# Altium PCB PD_BQ_Ref_Design_PCB.PcbDoc (part 1 of 4)
Units mil, origin at the board's own origin, x right, y up, seen from the top; angles counter-clockwise.
Board outline 2000 x 3702.76 mil, 4 copper layers (Top Layer, Signal Layer 1, Signal Layer 2, Bottom Layer), stack 61.2 mil thick; 124 components, 53 nets, 359 pads, 494 vias.
Unrouted connection lines stored in the file: 227.
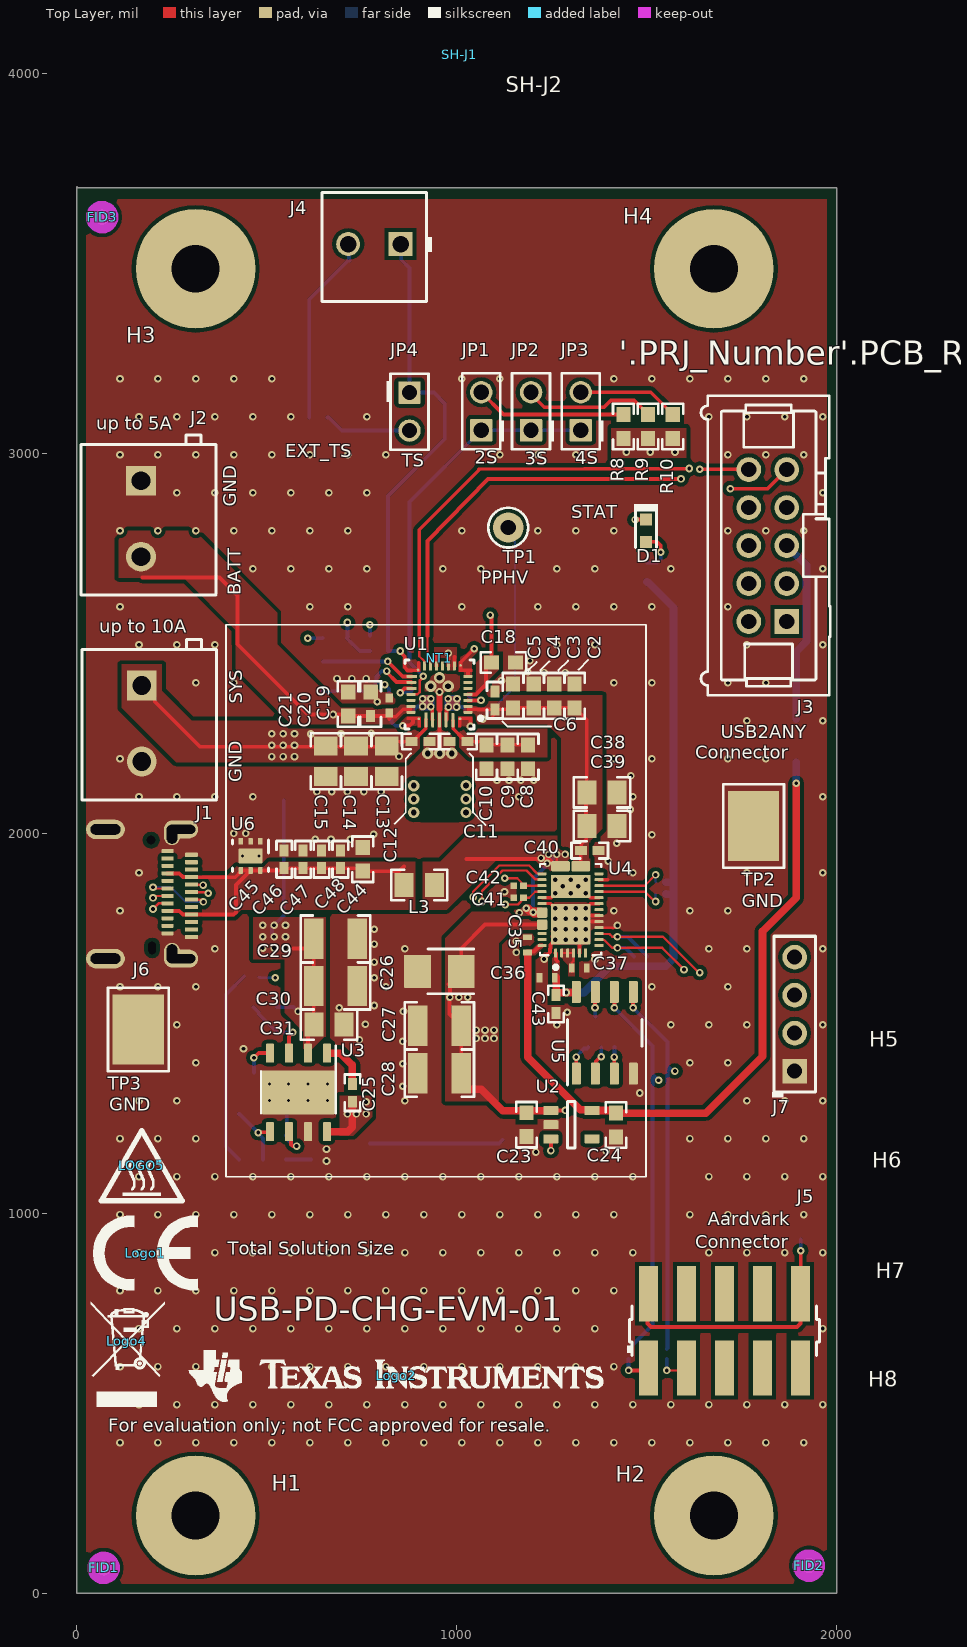
[diagram p0: Top Layer view]
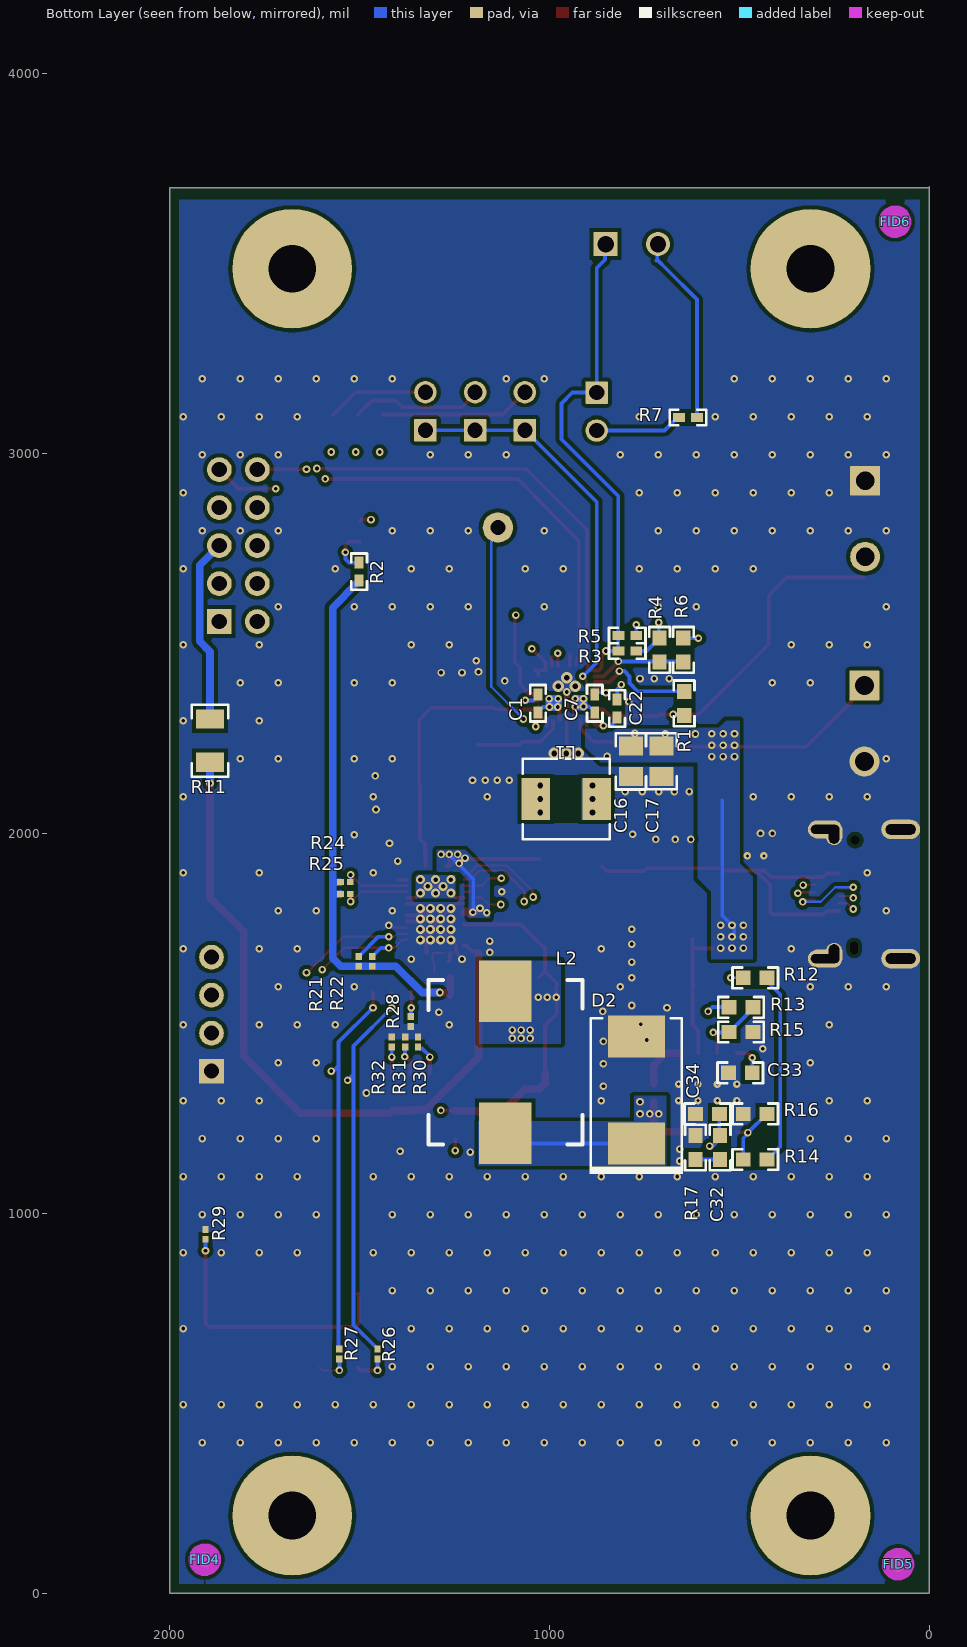
[diagram p1: Bottom Layer view, seen from below]
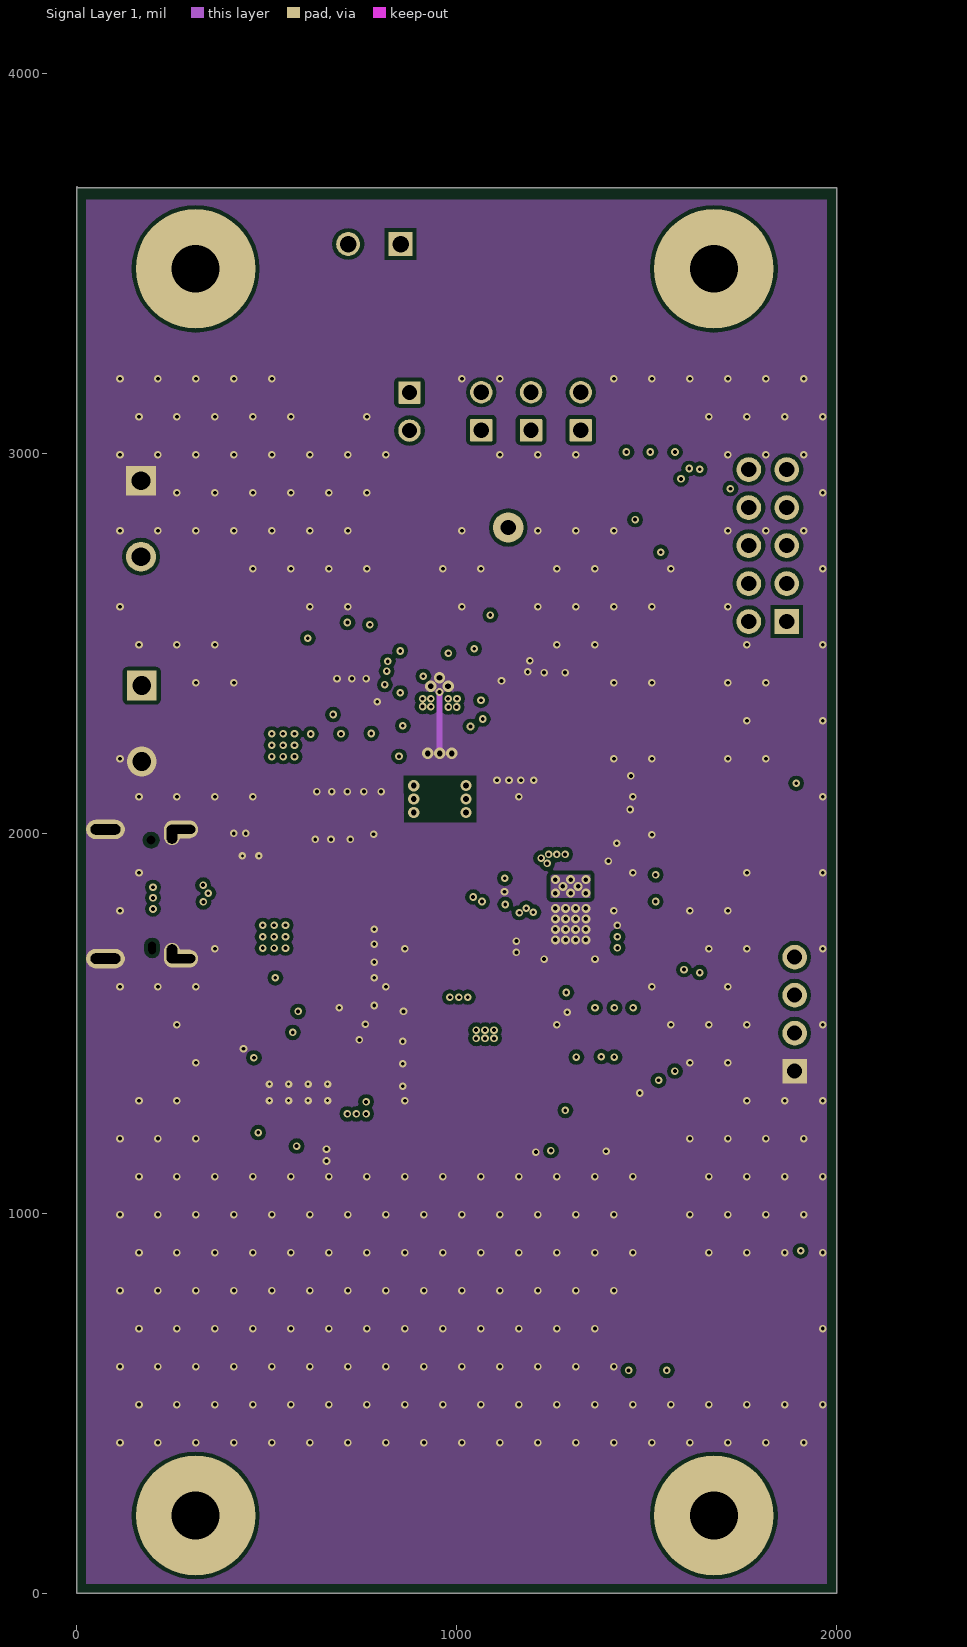
[diagram p2: Signal Layer 1]
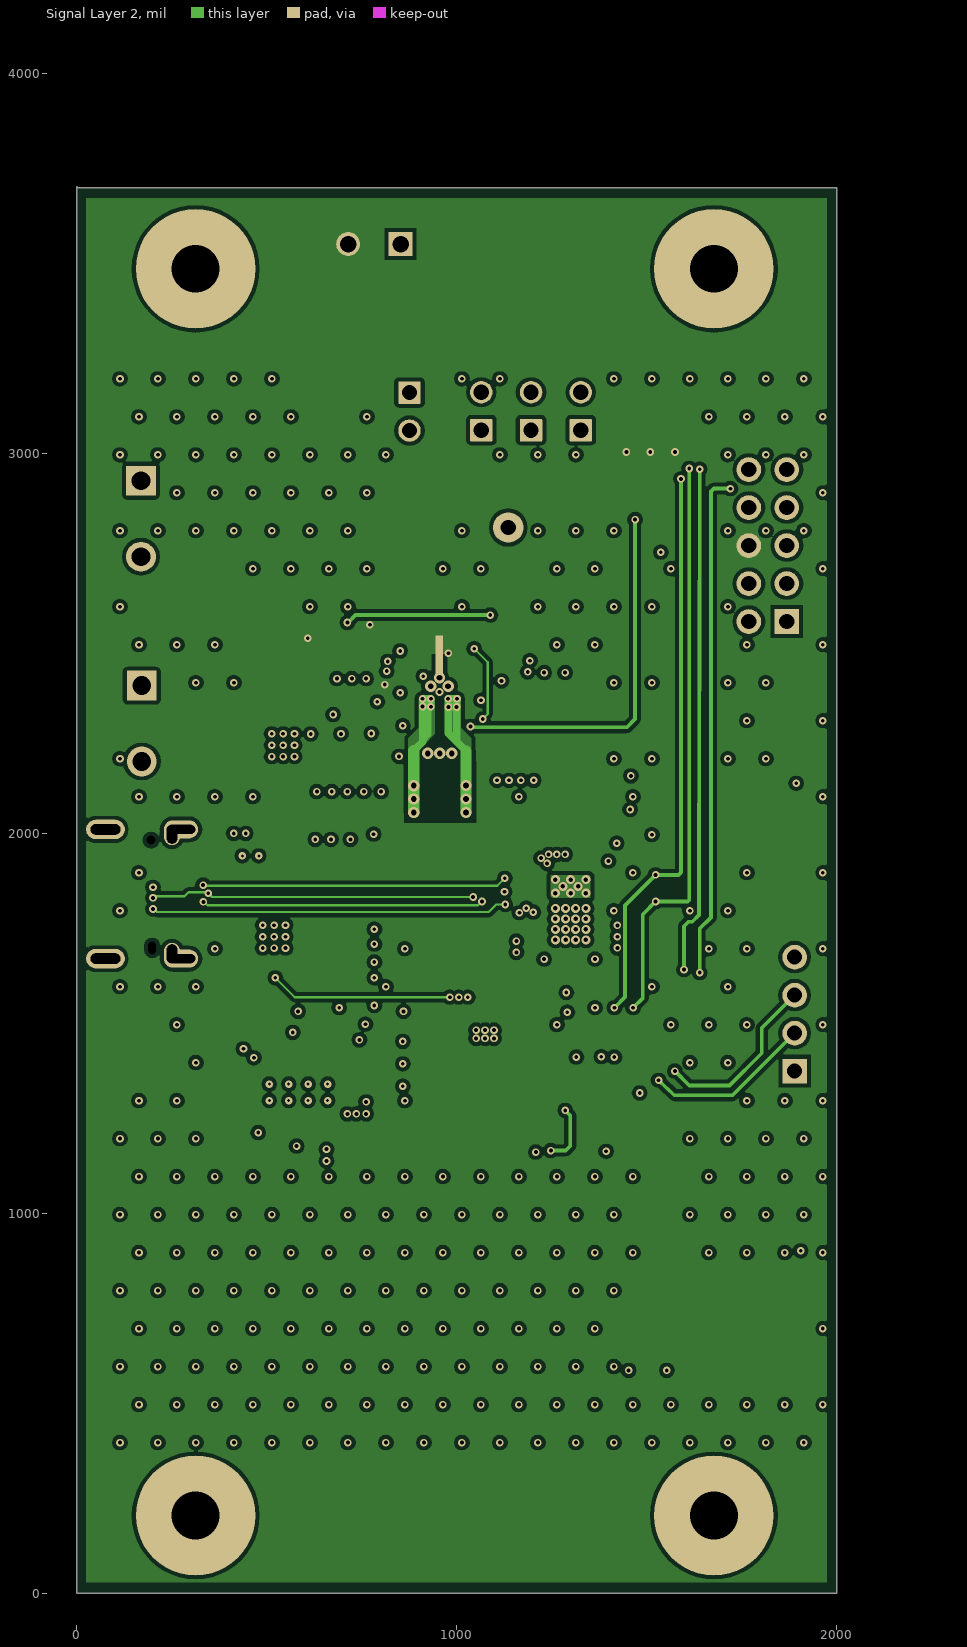
[diagram p3: Signal Layer 2]

## Layer stack, top to bottom
Top Solder: solder mask 0.4, Solder Resist, Dk 3.5
Top Layer: signal copper 2.8
Dielectric 1: prepreg 12, FR-4 High TG, Dk 4.2
Signal Layer 1: signal copper 2.8
Dielectric2: core 26, FR-4 High TG, Dk 4.2
Signal Layer 2: signal copper 2.8
Dielectric3: prepreg 12, FR-4 High TG, Dk 4.2
Bottom Layer: signal copper 2.8
Bottom Solder: solder mask 0.4, Solder Resist, Dk 3.5

## Board outline
0,0 2000,0 2000,3700 2.76,3700 0,3702.76

## Design rules (kind name [scope] priority, off if disabled: settings)
AcuteAngle [All] p1: minimum=4.50000000000000E+0001 checktracksonly=FALSE
AssemblyTestPointUsage [All] p1: valid=2
BoardOutlineClearance BoardOutlineClearance_MountingHoles [OnCopper and InComponentClass('Mounting Holes')] p1: gap=39.37 ignorepadtopadclearanceinfootprint=FALSE
BoardOutlineClearance BoardOutlineClearance_Poly [OnCopper and IsPoly] p2: gap=25 ignorepadtopadclearanceinfootprint=FALSE
BoardOutlineClearance [OnCopper and Not InComponentClass('Logo') and not InComponentClass('FiducialMark') and not InRegion(1000,500,4000,800) and not InPoly] p3: gap=15 ignorepadtopadclearanceinfootprint=FALSE
Clearance Clearance_Keepouts [((IsTrack Or IsArc) And Not InPoly) And IsFree and IsKeepOut vs ((IsTrack Or IsArc) And Not InPoly) And IsFree and IsKeepOut] p1: gap=0 ignorepadtopadclearanceinfootprint=FALSE
Clearance Clearance_Poly [InPolygon] p2: gap=10 ignorepadtopadclearanceinfootprint=TRUE
Clearance Clearance_FiducialMark [IsKeepOut and InComponentClass('FiducialMark') vs IsPad and InComponentClass('FiducialMark')] p3: gap=0 ignorepadtopadclearanceinfootprint=FALSE
Clearance [All] p4: gap=5 ignorepadtopadclearanceinfootprint=TRUE
ComponentClearance ComponentClearance_MountingHoles_FiducialMarks [InComponentClass('Mounting Holes') vs InComponentClass('FiducialMark')] p1: gap=50 collisioncheckmode=3 verticalgap=10 showdistances=FALSE
ComponentClearance ComponentClearance_Shunt [InComponentClass('Header') vs InComponentClass('Shunt')] p2: gap=0 collisioncheckmode=3 verticalgap=0 showdistances=FALSE
ComponentClearance ComponentClearance_Logo [InComponentClass('Logo')] p3: gap=50 collisioncheckmode=3 verticalgap=10 showdistances=FALSE
ComponentClearance ComponentClearance_ScrewToNut [(HasFootprint('NY PMS 440 0025 PH')) vs (HasFootprint('Keystone_1902C'))] p4: gap=5 collisioncheckmode=3 verticalgap=10 showdistances=FALSE
ComponentClearance ComponentClearance_MountingHoles [InComponent('H1')] p5: gap=25 collisioncheckmode=3 verticalgap=100000 showdistances=FALSE
ComponentClearance ComponentClearance_SmallPassives [HasFootprint('0201*') or HasFootprint('0402*') or HasFootprint('0508') or HasFootprint('0603*') or HasFootprint('0612') or HasFootprint('0805*') or HasFootprint('0815*') or HasFootprint('0830*') or HasFootprint('1206*') or HasFootprint('1210*') or HasFootprint('1808*') or HasFootprint('1812*') or HasFootprint('1825*') or HasFootprint('2010*') or HasFootprint('2220*') or HasFootprint('2225*') or HasFootprint('2512*') or HasFootprint('2728*') or HasFootprint('3518*') vs HasFootprint('0201*') or HasFootprint('0402*') or HasFootprint('0508') or HasFootprint('0603*') or HasFootprint('0612') or HasFootprint('0805*') or HasFootprint('0815*') or HasFootprint('0830*') or HasFootprint('1206*') or HasFootprint('1210*') or HasFootprint('1808*') or HasFootprint('1812*') or HasFootprint('1825*') or HasFootprint('2010*') or HasFootprint('2220*') or HasFootprint('2225*') or HasFootprint('2512*') or HasFootprint('2728*') or HasFootprint('3518*')] p6: gap=14.96 collisioncheckmode=3 verticalgap=10 showdistances=FALSE
ComponentClearance ComponentClearance_THtoSMT [IsThruComponent vs IsSMTComponent] p7: gap=40 collisioncheckmode=3 verticalgap=30 showdistances=FALSE
ComponentClearance ComponentClearance_THtoTH [IsThruComponent vs IsThruComponent] p8: gap=30 collisioncheckmode=3 verticalgap=30 showdistances=FALSE
ComponentClearance [All] p9: gap=20 collisioncheckmode=3 verticalgap=10 showdistances=FALSE
DiffPairsRouting [All] p1: maxlimit=100 minlimit=10 mostfreqgap=10 toplayer_minwidth=15 toplayer_maxwidth=15 toplayer_prefwidth=15 midlayer1_minwidth=15 midlayer1_maxwidth=15 midlayer1_prefwidth=15 midlayer2_minwidth=15 midlayer2_maxwidth=15 midlayer2_prefwidth=15 bottomlayer_minwidth=15 bottomlayer_maxwidth=15 bottomlayer_prefwidth=15 maxuncoupledlength=1000
FabricationTestPointUsage TestPointUsage [All] p1: valid=2 allowmultiple=FALSE
FabricationTestpoint Testpoint [All] p1: side=3 testpointundercomponent=TRUE minsize=40 maxsize=100 preferedsize=60 minholesize=0 maxholesize=40 preferedholesize=32 testpointgrid=1 allowsidetop=TRUE allowsidebottom=TRUE usegrid=TRUE gridtolerance=0.01
FanoutControl Fanout_LCC [IsLCC] p1: bgadir=Out bgaviamode=Centered fanoutstyle=Auto fanoutdirection=Alternating viagrid=1 // Fanout_LCC (Default Rule)
FanoutControl Fanout_BGA [IsBGA] p2: bgadir=Out bgaviamode=Centered fanoutstyle=Auto fanoutdirection=Alternating viagrid=1 // Fanout_BGA (Default Rule)
FanoutControl Fanout_Default [All] p4: bgadir=Out bgaviamode=Centered fanoutstyle=Auto fanoutdirection=Alternating viagrid=1 // Fanout_Default (Default Rule)
FanoutControl Fanout_Small [(CompPinCount < 5)] p5: bgadir=Out bgaviamode=Centered fanoutstyle=Auto fanoutdirection=OutThenIn viagrid=1 // Fanout_Small (Default Rule)
HoleSize [All] p1: absolutevalues=TRUE maxlimit=251 minlimit=7.87 maxpercent=80.000 minpercent=20.000
MinimumAnnularRing MinimumAnnularRing_ThermalPadVias [IsVia and InAnyComponent] p1: minimumring=5.91
MinimumAnnularRing [All] p2: minimumring=5
MinimumSolderMaskSliver MinimumSolderMaskSliver_Logo [InComponentClass('Logo') vs InComponentClass('Logo')] p1: minsoldermaskwidth=0.7
MinimumSolderMaskSliver [All] p2: minsoldermaskwidth=3
PlaneConnect [All] p1: planeconnectstyle=Relief reliefexpansion=10 reliefentries=4 reliefconductorwidth=10 reliefairgap=10
PolygonConnect [All] p1: connectstyle=Direct reliefconductorwidth=10 reliefentries=4 polygonreliefangle="90 Angle" airgapwidth=10
RoutingVias ThermalPadVias [IsVia and InAnyComponent] p1: holewidth=7.87 width=19.68 viastyle="Through Hole" minholewidth=7.87 minwidth=19.68 maxholewidth=12.99 maxwidth=23.62
RoutingVias [All] p2: holewidth=10 width=20 viastyle="Through Hole" minholewidth=5 minwidth=10 maxholewidth=40 maxwidth=65
SilkToBoardRegionClearance [Not ((IsComment or IsDesignator) And (Hide <> 'False')) and not InRegion(1000,500,4000,800)] p1:
SilkToSilkClearance SilkToSilkClearance_Pb-FreeLogo [(HasFootprint('Pb-Free_Overlay_Medium') OR HasFootprint('Pb-Free_Overlay_Small')) vs (HasFootprint('Pb-Free_Overlay_Medium') OR HasFootprint('Pb-Free_Overlay_Small'))] p1: silktosilkclearance=0
SilkToSilkClearance [All] p2: silktosilkclearance=1
SilkToSolderMaskClearance SilkToComponentPadClearance [(IsPad or IsFill or IsRegion) and InAnycomponent] p1: minsilkscreentomaskgap=3 clearancetoexposedcopper=TRUE
SilkToSolderMaskClearance "Silk to Solder Mask Opening" [All] p2: minsilkscreentomaskgap=3.94 clearancetoexposedcopper=FALSE
SolderMaskExpansion [All] p1: expansion=1.97
UnRoutedNet [All] p1: checkbadconnections=TRUE
Width [All] p1: maxlimit=100 minlimit=6 preferedwidth=10 checkconnectedcopper=TRUE
14 further rules are at their usual default settings.

## Classes and differential pairs
component class Shunt: SH-J1 SH-J2
component class "Mounting Holes": H1 H2 H3 H4
component class FiducialMark: FID1 FID2 FID3 FID4 FID5 FID6
component class Logo: Logo2
component class Type_C_Port: C44 C45 C46 C47 C48 J6 L3 U6
component class TPS25750D: C35 C36 C37 C38 C39 C40 C41 C42 C43 J5 J7 R24 R25 R26 R27 R28 R29 R30 R31 R32 U4 U5
component class Power_5V_3.3V: C23 C24 C25 C26 C27 C28 C29 C30 C31 C32 C33 C34 D2 L2 R12 R13 R14 R15 R16 R17 U2 U3
component class Header: J5 J7 JP1 JP2 JP3 JP4
component class BQ25792: C1 C2 C3 C4 C5 C6 C7 C8 C9 C10 C11 C12 C13 C14 C15 C16 C17 C18 C19 C20 C21 C22 D1 J1 J2 J3 J4 JP1 JP2 JP3 JP4 L1 NT1 R1 R2 R3 R4 R5 R6 R7 R8 R9 R10 R11 R21 R22 TP1 TP2 TP3 U1
component class PD_BQ_Ref_Design_Hardware: FID1 FID2 FID3 FID4 FID5 FID6 H1 H2 H3 H4 H5 H6 H7 H8 Logo1 Logo2 Logo3 Logo4 LOGO5 SH-J1 SH-J2 ZZ1
component class AssemblyNote: ZZ1

## Components (designator, comment, footprint, x,y, rotation, side; value= is the part's Value field where it differs from the comment)
C1 "GRM155R71E473KA88D" 0402 1030.63,2342.52 r270 bottom value=0.047uF
C2 "GRT188R61E106ME13D" 0603#1 1310.16,2362.2 r270 top value=10uF
C3 "GRT188R61E106ME13D" 0603#1 1257.01,2362.2 r270 top value=10uF
C4 "GRT188R61E106ME13D" 0603#1 1202.87,2362.2 r270 top value=10uF
C5 "GRT188R61E106ME13D" 0603#1 1148.74,2362.2 r270 top value=10uF
C6 "C1005X7R1H104K050BE" 0402 1100.51,2350.39 r90 top value=0.1uF
C7 "GRM155R71E473KA88D" 0402 881.02,2342.52 r270 bottom value=0.047uF
C8 "GRT188R61E106ME13D" 0603#1 1188.11,2201.77 r90 top value=10uF
C9 "GRT188R61E106ME13D" 0603#1 1133.98,2201.77 r90 top value=10uF
C10 "GRT188R61E106ME13D" 0603#1 1078.86,2201.77 r90 top value=10uF
C11 "C1005X7R1H104K050BE" 0402 1005.04,2242.13 r180 top value=0.1uF
C12 "C1005X7R1H104K050BE" 0402 904.65,2242.13 r0 top value=0.1uF
C13 "C2012X5R1E106K125AB" 0805_HV 816.06,2189.96 r270 top value=10uF
C14 "C2012X5R1E106K125AB" 0805_HV 735.35,2189.96 r270 top value=10uF
C15 "C2012X5R1E106K125AB" 0805_HV 655.63,2189.96 r270 top value=10uF
C16 "C2012X5R1E106K125AB" 0805_HV 786.06,2189.61 r270 bottom value=10uF
C17 "C2012X5R1E106K125AB" 0805_HV 705.35,2189.96 r270 bottom value=10uF
C18 "GRM188R61C475KAAJ" 0603#1 1123.15,2449.8 r0 top value=4.7uF
C19 "C1005X7R1H104K050BE" 0402L 822.83,2336.61 r90 top value=0.1uF
C20 "GRT188R61E106ME13D" 0603#2 773.74,2340.55 r90 top value=10uF
C21 "GRT188R61E106ME13D" 0603#1 714.68,2340.55 r90 top value=10uF
C22 "C0402C102K5RACTU" 0402 821.97,2328.74 r90 bottom value=1000pF
C23 "GRT188R61E106ME13D" 0603#1 1184.05,1233.36 r90 top value=10uF
C24 "GRT188R61E106ME13D" 0603#1 1419.46,1232.38 r90 top value=10uF
C25 "C1005X7R1H104K050BE" 0402 725.65,1317.47 r270 top value=0.1uF
C26 "T520B107M006ATE015" 3528-21 954.72,1636.81 r180 top value=100uF
C27 "GRM32ER61A476KE20L" 1210_270 954.72,1494.09 r180 top value=47uF
C28 "GRM32ER61A476KE20L" 1210_270 954.72,1369.09 r180 top value=47uF
C29 "GRM32ER71H475KA88L" 1210_270 681.1,1722.44 r0 top value=4.7uF
C30 "GRM32ER71H475KA88L" 1210_270 681.1,1598.43 r0 top value=4.7uF
C31 "GRM216R71H103KA01D" 0805_HV 664.18,1496.75 r0 top value=0.01uF
C32 "GRM188R71H222KA01D" 0603#1 551.18,1173.23 r270 bottom value=2200pF
C33 "06031C103KAT2A" 0603#1 498.03,1370.08 r0 bottom value=0.01uF
C34 "GRM1885C1H220JA01D" 0603#1 584.65,1261.81 r0 bottom value=22pF
C35 "CL05A106MP5NUNC" 0402_070 1187.01,1706.69 r90 top value=10uF
C36 "CL05A106MP5NUNC" 0402_070 1238.19,1620.08 r180 top value=10uF
C37 "CL05A106MP5NUNC" 0402_070 1322.83,1645.67 r0 top value=10uF
C38 "C2012X5R1V226M125AC" 0805_HV 1382.69,2108.19 r0 top value=22uF
C39 "C2012X5R1V226M125AC" 0805_HV 1382.69,2019.61 r0 top value=22uF
C40 "GMK105BJ104KV-F" 0402 1350.39,1954.72 r0 top value=0.1uF
C41 "GRM033R71H331KA12D" 0201_033 1163.39,1830.71 r180 top value=330pF
C42 "GRM033R71H331KA12D" 0201_033 1163.39,1862.2 r180 top value=330pF
C43 "GMK105BJ104KV-F" 0402 1261.81,1551.18 r270 top value=0.1uF
C44 "GRM188R6YA475KE15D" 0603#1 752.95,1932.09 r90 top value=4.7uF
C45 "C0402C103J5RACTU" 0402 546.26,1932.09 r270 top value=0.01uF
C46 "C0402C103J5RACTU" 0402 595.47,1932.09 r270 top value=0.01uF
C47 "C0402C103J5RACTU" 0402 644.68,1932.09 r270 top value=0.01uF
C48 "C0402C103J5RACTU" 0402 693.9,1932.09 r270 top value=0.01uF
D1 "LTST-C190GKT" LED_LTST-C190 1498.03,2796.26 r90 top value=Green
D2 "CDBC540-G" SMC 771.65,1324.8 r90 bottom value=40V
FID1 "Fiducial" Fiducial10-20 70.87,66.93 r0 top
FID2 "Fiducial" Fiducial10-20 1927.17,72.83 r0 top
FID3 "Fiducial" Fiducial10-20 66.93,3622.05 r0 top
FID4 "Fiducial" Fiducial10-20 1907.48,88.58 r180 bottom
FID5 "Fiducial" Fiducial10-20 82.68,76.77 r180 bottom
FID6 "Fiducial" Fiducial10-20 90.55,3610.24 r180 bottom
H1 "NY PMS 440 0025 PH" "NY PMS 440 0025 PH" 312.99,204.72 r0 top
H2 "NY PMS 440 0025 PH" "NY PMS 440 0025 PH" 1677.17,204.72 r0 top
H3 "NY PMS 440 0025 PH" "NY PMS 440 0025 PH" 312.99,3486.22 r0 top
H4 "NY PMS 440 0025 PH" "NY PMS 440 0025 PH" 1677.16,3486.22 r0 top
H5 "1902C" Keystone_1902C 2226.38,1283.46 r0 top
H6 "1902C" Keystone_1902C 2234.25,964.57 r0 top
H7 "1902C" Keystone_1902C 2244.09,673.23 r0 top
H8 "1902C" Keystone_1902C 2224.41,387.8 r0 top
J1 "ED120/2DS" On-Shore_ED120_2DS 171.26,2289.37 r270 top
J2 "ED120/2DS" On-Shore_ED120_2DS 169.29,2828.35 r270 top
J3 "N2510-6002-RB" CONN_2510-6002 1819.09,2757.68 r90 top
J4 "0393570002" MOLEX_39357-0002 783.46,3551.18 r180 top
J5 "TSM-105-01-L-DV-P" Samtec_TSM-105-01-x-DV 1704.54,691.02 r90 top
J6 "DX07S024JJ2R1300" JAE_DX07S024JJ2R1300 4.92,1840.55 r270 top
J7 "PEC04SAAN" SULLINS_PEC04SAAN 1889.76,1524.41 r90 top
JP1 "Header_2x1" CONN_PEC02SAAN 1064.96,3111.22 r90 top
JP2 "Header_2x1" CONN_PEC02SAAN 1195.87,3111.22 r90 top
JP3 "Header_2x1" CONN_PEC02SAAN 1326.77,3111.22 r90 top
JP4 "Header_2x1" CONN_PEC02SAAN 875.98,3110.24 r270 top
L1 "IHLP2020BZER1R0M11" IHLP-2020BZ 955.83,2090.43 r180 bottom value=1uH
L2 "74437368047" WE-LHMI_1040 1116.14,1397.64 r90 bottom value=4.7uH
L3 "FBMJ2125HM210NT" 0805_HV 901.57,1864.17 r0 top value="21 ohm"
Logo1 "CE Mark" CE_Mark_5mm 181.1,895.67 r0 top
Logo2 "Texas Instruments" TI_Horizontal_Overlay_Small 840.55,572.83 r0 top
Logo3 "FCC disclaimer" FCC_disclaimer 3989.17,850.39 r0 top
Logo4 "WEEE logo" WEEE_Minimum 131.89,663.39 r0 top
LOGO5 "CAUTION HOT SURFACE" IEC_HotSurface_Small 171.26,1125.98 r0 top
NT1 "Net-Tie" Net-Tie_20milWide_60milLong 954.72,2461.1 r90 top net-tie
R1 "RC0603FR-07100RL" 0603#1 645.67,2342.52 r90 bottom value=100
R2 "CRCW04022K21FKED" 0402 1500.98,2688.98 r270 bottom value=2.21k
R3 "Resistor" 0402 795.39,2480.31 r180 bottom value=5.23k
R4 "RC0603FR-07137KL" 0603#1 710.68,2483.27 r90 bottom value=137k
R5 "Resistor" 0402 795.39,2520.67 r0 bottom value=30.1k
R6 "RC0603FR-07100KL" 0603#1 647.82,2483.27 r270 bottom value=100k
R7 "Resistor" 0402 635.83,3094.49 r0 bottom value=10.0k
R8 "RC0603FR-076K04L" 0603#1 1438.98,3070.87 r90 top value=6.04k
R9 "CRCW060310K5FKEA" 0603#1 1503.94,3070.87 r90 top value=10.5k
R10 "CRCW060317K4FKEA" 0603#1 1568.9,3070.87 r90 top value=17.4k
R11 "ERJ-8ENF10R0V" 1206 1893.7,2244.09 r270 bottom value=10.0
R12 "CRCW060351R1FKEA" 0603#1 458.66,1620.08 r0 bottom value=51.1
R13 "CRCW0603665KFKEA" 0603#1 496.06,1542.32 r0 bottom value=665k
R14 "CRCW060310K2FKEA" 0603#1 458.66,1141.73 r180 bottom value=10.2k
R15 "CRCW0603130KFKEA" 0603#1 496.06,1477.36 r0 bottom value=130k
R16 "CRCW06031K96FKEA" 0603#1 458.66,1261.81 r180 bottom value=1.96k
R17 "CRCW060337K4FKEA" 0603#1 616.14,1173.23 r270 bottom value=37.4k
R21 "CRCW02012K20FKED" 0201 1501.97,1663.39 r270 bottom value=2.20k
R22 "CRCW02012K20FKED" 0201 1466.54,1663.39 r270 bottom value=2.20k
R24 "CRCW02012K20FKED" 0201 1537.4,1872.05 r180 bottom value=2.20k
R25 "CRCW02012K20FKED" 0201 1537.4,1840.55 r180 bottom value=2.20k
R26 "CRCW02010000Z0ED" 0201 1452.76,629.92 r270 bottom value=0
R27 "CRCW02010000Z0ED" 0201 1553.15,629.92 r270 bottom value=0
R28 "CRCW020110K0FKED" 0201 1365.16,1504.92 r90 bottom value=10.0k
R29 "CRCW02010000Z0ED" 0201 1905.51,944.88 r270 bottom value=0
R30 "CRCW020110K0FKED" 0201 1346.46,1450.79 r270 bottom value=10.0k
R31 "CRCW020110K0FKED" 0201 1379.92,1450.79 r270 bottom value=10.0k
R32 "CRCW020110K0FKED" 0201 1415.35,1450.79 r270 bottom value=10.0k
SH-J1 "SNT-100-BK-G" SNT-100-BK-G 1007.87,4049.21 r90 top value=1x2
SH-J2 "SNT-100-BK-G" SNT-100-BK-G 1173.23,3824.8 r90 top value=1x2
TP1 "5000" Keystone5000 1135.83,2805.12 r90 top
TP2 "5016" Testpoint_Keystone_Compact 1781.5,2019.69 r90 top
TP3 "5016" Testpoint_Keystone_Compact 162.4,1484.25 r270 top
U1 "BQ25792RQM" RQM0029A-MFG 954.84,2366.04 r180 top
U2 "TLV75533PDBVR" DBV0005A_N 1302.17,1233.36 r0 top
U3 "TPS54531DDAR" DDA0008E_L 583.66,1318.62 r270 top
U4 "TPS25750DRJK" RJK0038B-C01-MFG 1300.01,1799.39 r90 top
U5 "CAT24C256WI-G" SOIC-8 1389.96,1475.32 r90 top
U6 "TVS2200DRVR" DRV0006A 457.68,1940.94 r270 top
ZZ1 "This Assembly Note is for PCB labels only" AssemblyNoteLabel 190.91,4268.71 r0 top

## Footprints (in the part's own frame and the unit in brackets; to place one, negate y for a bottom-side part, rotate by r counter-clockwise, add the part's x,y. Pads: shape width x height; smd on the part's side, far side on the other; paste and mask are expansions set on the pad)
0201 [mm] "Data from Kemet datasheet CC101_COM dated 7/28/11"
  rect 0.46x0.42 smd: 1(-0.33,0) 2(0.33,0)
  body extent -0.31,-0.16 0.31,0.16, height 0.26
0201_033 [mm] "SMD, 2-Leads, Height 0.33mm"
  rect 0.46x0.42 smd: 1(-0.33,0) 2(0.33,0)
  body extent -0.31,-0.16 0.31,0.16, height 0.33
0402 [mm] "0402 from SM-752 data"
  rect 0.8x0.6 smd: 1(-0.6,0) 2(0.6,0)
  silkscreen extent -1.22,-0.52 1.22,0.52, body extent -0.55,-0.3 0.55,0.3, height 0.6
0402_070 [mil] "SMD, 2-Leads, Body 1.2x0.7mm, Height 0.7mm"
  rect 15x24 smd: 1(-20,0) 2(20,0)
  body extent -24,-14 24,14, height 28
0402L [mm] "0402 from SM-752 data"
  rect 0.6x0.5 smd: 1(-0.5,0) 2(0.5,0)
  body extent -0.55,-0.3 0.55,0.3, height 0.6
0603#1 [mm] "0603 from SM-752 data"
  rect 1x0.95 smd: 1(-0.8,0) 2(0.8,0)
  silkscreen extent -1.52,-0.69 1.52,0.69, body extent -0.87,-0.47 0.87,0.47, height 1
0603#2 [mm] "0603 from SM-752 data"
  rect 0.8x0.6 smd: 1(-0.8,0)
  rect 1x0.95 smd: 2(0.8,0)
  silkscreen extent -1.52,-0.69 1.52,0.69, body extent -0.87,-0.47 0.87,0.47, height 1
0805_HV [mil] "0805 with 30mil clearance between pads"
  rect 50x63 smd: 1(-40,0) 2(40,0)
  silkscreen extent -74,-40 74,40, body extent -43,-29 43,29, height 57
1206 [mm] "1206 from SM-752 data"
  rect 1.3x1.85 smd: 1(-1.45,0) 2(1.45,0)
  silkscreen extent -2.4,-1.21 2.4,1.21, body extent -1.7,-0.9 1.7,0.9, height 1.35
1210_270 [mm] "1210"
  rect 1.3x2.7 smd: 1(-1.45,0) 2(1.45,0)
  silkscreen extent -2.32,-1.57 2.32,1.57, body extent -1.7,-1.35 1.7,1.35, height 2.7
3528-21 [mm] "Medium Density IPC, based on Kemet datasheet 2016-10-20"
  rrect6% 1.8x2.23 smd: 1(-1.46,0) 2(1.46,0)
  silkscreen extent -2.29,-1.5 0.76,1.5, body extent -1.85,-1.5 1.85,1.5, height 2.12
AssemblyNoteLabel [mil] "Assembly Note for PCB Labels"
CE_Mark_5mm [mil] "Minimum text height for CE Mark"
  silkscreen extent -138,-98 138,98
CONN_2510-6002 [mm] "3M 2500 series TS-0770-L December 15, 2011"
  rect 1.65x1.65 hole 1.016: 1(-5.08,-1.27)
  round 1.65 hole 1.016: 2(-5.08,1.27) 3(-2.54,-1.27) 4(-2.54,1.27) 5(0,-1.27) 6(0,1.27) 7(2.54,-1.27) 8(2.54,1.27) 9(5.08,-1.27) 10(5.08,1.27)
  silkscreen extent -10.01,-4.17 10.01,4.47, body extent -10.01,-4.11 10.01,4.52, height 9.92
CONN_PEC02SAAN [mm] "SULLINS"
  rrect7% 1.5x1.5 hole 1.016: 1(-1.27,0)
  round 1.5 hole 1.016: 2(1.27,0)
  silkscreen extent -2.54,-1.52 2.54,1.27, body extent -2.54,-1.27 2.54,1.27, height 8.38
DBV0005A_N [mm] "SOT23, 5-Leads, Body 2.9x1.6mm, Pitch 0.95mm, Lead Span 2.8mm, IPC Medium Density"
  rrect17% 1x0.6 smd: 1(-1.375,0.95) 2(-1.375,0) 3(-1.375,-0.95) 4(1.375,-0.95) 5(1.375,0.95)
  silkscreen extent -0.25,-1.55 0.25,1.55, body extent -1.42,-1.46 1.42,1.46, height 1.09
DDA0008E_L [mm]
  rrect18% 1.25x0.55 smd: 1(-2.625,1.905) 2(-2.625,0.635) 3(-2.625,-0.635) 4(-2.625,-1.905) 5(2.625,-1.905) 6(2.625,-0.635) 7(2.625,0.635) 8(2.625,1.905)
  rrect7% 2.95x4.9 smd: 9(0,0)
  rrect4% 2.4x3.1 on Top Paste: 9(0,0)
  rrect4% 2.4x3.1 on Top Solder: 9(0,0)
  silkscreen extent -3.13,-2.5 1.4,2.5, body extent -3,-2.45 3,2.45, height 1.57
DRV0006A [mm] "SON, 6-Leads, Body 2x2mm, Pitch 0.65mm, Thermal Pad 1.6x1mm, TI Recommended"
  rrect33% 0.45x0.3 smd: 1(-0.975,0.65) 2(-0.975,0) 3(-0.975,-0.65) 4(0.975,-0.65) 5(0.975,0) 6(0.975,0.65)
  rrect14% 1x0.7 on Top Paste: 7(0,0.45) 7(0,-0.45)
  rrect10% 1x1.6 smd paste-0.5: 7(0,0)
  silkscreen extent -1.05,-1.2 1.05,1.2, body extent -1.05,-1.05 1.05,1.05, height 0.81
FCC_disclaimer [mil]
Fiducial10-20 [mm]
  round 1 smd mask+0.5: 1(0,0)
  Top Layer keep-out circle w1.178: c0,0 r0.5
IEC_HotSurface_Small [mil]
  silkscreen extent -107,-93 107,92
IHLP-2020BZ [mm] "Vishay Dale recommended land pattern.  Document 34261 rev 12-Sept-13"
  rect 1.915x2.79 smd: 1(-2.037,0) 2(2.037,0)
  silkscreen extent -2.9,-2.7 2.9,2.7, body extent -2.87,-2.72 2.87,2.72, height 2
JAE_DX07S024JJ2R1300 [mm] "Receptacle, USB 3.1 Type C, R/A, SMT"
  rrect37% 0.27x0.9 smd: A1(-2.625,7.55) A2(-2.125,7.55) A3(-1.625,7.55) A4(-1.125,7.55) A5(-0.625,7.55) A6(-0.125,7.55) A7(0.375,7.55) A8(0.875,7.55) A9(1.375,7.55) A10(1.875,7.55) A11(2.375,7.55) A12(2.875,7.55)
  round 0.3 hole 0.6 unplated: ALIGN1(-3.6,4.85)
  rrect100% 0.55x0.3 hole 0.5 slot 0.85 at 0 deg unplated: ALIGN2(3.6,4.915)
  rrect37% 0.27x0.8 smd: B1(2.625,5.95) B2(2.125,5.95) B3(1.625,5.95) B4(1.125,5.95) B5(0.625,5.95) B6(0.125,5.95) B7(-0.375,5.95) B8(-0.875,5.95) B9(-1.375,5.95) B10(-1.875,5.95) B11(-2.375,5.95) B12(-2.875,5.95)
  rrect100% 1.2x2.3 hole 0.6 slot 1.9 at 90 deg: S1(-4.32,6.85) S2(4.32,6.85)
  rrect100% 1.45x1.1 hole 0.7 slot 1.25 at 0 deg: S1(-3.995,6.25) S2(3.995,6.25)
  rrect100% 1.3x2.6 hole 0.7 slot 2 at 90 deg: S3(-4.32,1.8) S4(4.32,1.8)
  body extent -4.47,-0.5 4.47,7.67, height 3.14
Keystone5000 [mil] "For Keystone 500x miniature loop terminals"
  round 80 hole 40: 1(0,0)
  silkscreen extent -52,-52 52,52, body extent -49,-49 49,49, height 182
Keystone_1902C [mil] "Hex Standoff, 4-40 threaded, nylon"
  round 1 on Mech3: 0(0,0)
  body extent -145,-126 146,126, height 501
LED_LTST-C190 [mm] "Lite-On"
  rect 0.8x0.8 smd: 1(-0.75,0) 2(0.75,0)
  silkscreen extent -1.1,-0.8 1.8,0.8, body extent -0.85,-0.45 0.85,0.45, height 0.9
MOLEX_39357-0002 [mm] "Terminal Block, 3.5 mm, 2x1, TH"
  rect 1.6x1.6 hole 1.1: 1(-1.75,0)
  round 1.6 hole 1.1: 2(1.75,0)
  silkscreen extent -3.86,-3.45 3.5,3.84, body extent -3.55,-3.45 3.56,3.84, height 8.51
Net-Tie_20milWide_60milLong [mil] "20mil net tie, no solder mask opening, no solder paste"
  rect 60x20 on Mid2: 1(-30,0) 2(30,0)
"NY PMS 440 0025 PH" [mm] "4-40 nylon screw and mounting hole"
  round 8 hole 3.2: 1(0,0)
  body extent -3.3,-3.3 3.3,3.3, height 2.69
On-Shore_ED120_2DS [mm] "ONSHORE"
  rrect5% 2x2 hole 1.25: 1(-2.54,0)
  round 2 hole 1.25: 2(2.54,0)
  silkscreen extent -5.6,-4 5.12,5, body extent -5.78,-4 5.08,5, height 13
RJK0038B-C01-MFG [mm]
  rrect50% 0.6x0.2 smd paste+0 mask-1000: 1(-2.9,1) 2(-2.9,0.6) 3(-2.9,0.2) 4(-2.9,-0.2) 5(-2.9,-0.6) 6(-2.9,-1)
  rrect50% 0.2x0.6 smd paste+0 mask-1000: 7(-2.4,-1.9) 8(-2,-1.9) 9(-1.6,-1.9) 10(-1.2,-1.9) 11(-0.8,-1.9) 12(-0.4,-1.9) 13(0,-1.9) 14(0.4,-1.9) 15(0.8,-1.9) 16(1.2,-1.9) 17(1.6,-1.9) 18(2,-1.9) 19(2.4,-1.9) 26(2.4,1.9) 27(2,1.9) 28(1.6,1.9) 29(1.2,1.9) 30(0.8,1.9) 31(0.4,1.9) 36(-1.6,1.9) 37(-2,1.9) 38(-2.4,1.9)
  rrect50% 0.4x0.2 smd paste-1000 mask-1000: 20(2.8,-1.1) 21(2.8,-0.65) 22(2.8,-0.2) 23(2.8,0.2) 24(2.8,0.65) 25(2.8,1.1)
  rrect50% 0.2x0.4 smd paste-1000 mask-1000: 32(0,1.8) 33(-0.4,1.8) 34(-0.8,1.8) 35(-1.2,1.8)
  rrect4% 2.72x2.65 smd paste-1000 mask-1000: 39(-0.965,0)
  rrect7% 1.53x2.65 smd paste-1000 mask-1000: 40(1.56,0)
  rrect29% 0.7x0.7 smd paste-1000 mask-1000: ""(-1,1.9) ""(-0.2,1.9)
  rrect29% 0.7x1.253 smd paste-1000 mask-1000: ""(2.9,-0.677) ""(2.9,0.677)
  silkscreen extent -3.97,-2.05 3.05,2.05, body extent -3.3,-2.3 3.35,2.35, height 0.25
RQM0029A-MFG [mm]
  round 0.192 smd: 1(-1.369,1.631)
  rrect50% 0.6x0.2 smd: 2(-1.9,1.2) 3(-1.9,0.8) 4(-1.9,0.4) 5(-1.9,0) 6(-1.9,-0.4) 7(-1.9,-0.8) 8(-1.9,-1.2) 20(1.9,0) 21(1.9,0.4) 22(1.9,0.8) 23(1.9,1.2)
  round 0.158 smd: 9(-1.412,-1.937)
  rrect50% 0.2x0.6 smd: 10(-1,-1.9) 11(-0.6,-1.9) 12(-0.2,-1.9) 13(0.2,-1.9) 14(0.6,-1.9) 15(1,-1.9)
  round 0.175 smd: 16(1.431,-1.631) 24(1.381,1.631)
  rrect50% 0.7x0.2 smd: 17(1.85,-1.2)
  rrect50% 0.65x0.2 smd: 18(1.875,-0.8)
  rrect50% 0.68x0.2 smd: 19(1.86,-0.4)
  rrect50% 0.2x1 smd: 25(0.9,1.7) 26(0.45,1.7) 27(0,1.7) 28(-0.45,1.7)
  rrect50% 0.2x0.95 smd: 29(-0.9,1.725)
  Top Layer region: 2.2,1.65 2.196,1.669 2.185,1.685 2.169,1.696 2.15,1.7 2.15,1.7 1.45,1.7 1.45,2.15 1.446,2.169 1.435,2.185 1.419,2.196 1.4,2.2 1.4,2.2 1.3,2.2 1.275,2.193 1.257,2.175 1.25,2.15 1.25,2.15 1.25,1.55 1.254,1.531 1.265,1.515 1.281,1.504 1.3,1.5 1.3,1.5 2.15,1.5 2.169,1.504 2.185,1.515 2.196,1.531 2.2,1.55 2.2,1.55
  Top Layer region: 2.2,-1.65 2.193,-1.675 2.175,-1.693 2.15,-1.7 2.15,-1.7 1.5,-1.7 1.5,-2.15 1.496,-2.169 1.485,-2.185 1.469,-2.196 1.45,-2.2 1.45,-2.2 1.35,-2.2 1.325,-2.193 1.307,-2.175 1.3,-2.15 1.3,-2.15 1.3,-1.55 1.304,-1.531 1.315,-1.515 1.331,-1.504 1.35,-1.5 1.35,-1.5 2.15,-1.5 2.169,-1.504 2.185,-1.515 2.196,-1.531 2.2,-1.55 2.2,-1.55
  Top Layer region: -2.2,-1.65 -2.193,-1.675 -2.175,-1.693 -2.15,-1.7 -2.15,-1.7 -1.5,-1.7 -1.5,-2.15 -1.496,-2.169 -1.485,-2.185 -1.469,-2.196 -1.45,-2.2 -1.45,-2.2 -1.35,-2.2 -1.331,-2.196 -1.315,-2.185 -1.304,-2.169 -1.3,-2.15 -1.3,-2.15 -1.3,-1.55 -1.304,-1.531 -1.315,-1.515 -1.331,-1.504 -1.35,-1.5 -1.35,-1.5 -2.15,-1.5 -2.169,-1.504 -2.185,-1.515 -2.196,-1.531 -2.2,-1.55 -2.2,-1.55
  Top Layer region: -2.2,1.65 -2.193,1.675 -2.175,1.693 -2.15,1.7 -2.15,1.7 -1.45,1.7 -1.45,2.15 -1.443,2.175 -1.425,2.193 -1.4,2.2 -1.4,2.2 -1.3,2.2 -1.275,2.193 -1.257,2.175 -1.25,2.15 -1.25,2.15 -1.25,1.55 -1.254,1.531 -1.265,1.515 -1.281,1.504 -1.3,1.5 -1.3,1.5 -2.15,1.5 -2.169,1.504 -2.185,1.515 -2.196,1.531 -2.2,1.55 -2.2,1.55
  silkscreen extent -2.88,-2.3 2.3,2.3, body extent -2.3,-2.3 2.3,2.3, height 0.25
Samtec_TSM-105-01-x-DV [mm] "Header, 2.54mm, 5x2, SMT"
  rect 3.68x1.27 smd: 1(-2.475,5.08) 2(2.475,5.08) 3(-2.475,2.54) 4(2.475,2.54) 5(-2.475,0) 6(2.475,0) 7(-2.475,-2.54) 8(2.475,-2.54) 9(-2.475,-5.08) 10(2.475,-5.08)
  silkscreen extent -1.65,-6.35 1.65,6.49, body extent -3.85,-6.35 3.85,6.35, height 9.65
SMC [mil] "Molded Diode, 2-Leads, Body 6.9x5.8mm, IPC Medium Density, based on OnSemi component dimensions and land patterns"
  rect 110x150 smd: 1(-140.49,0) 2(140.49,0)
  silkscreen extent -221,-123 189,124, body extent -156,-116 156,116, height 91
SNT-100-BK-G [mil] "Samtec STEP model"
  round 1 on Mech3: 0(0,0)
  body extent -100,-50 100,50, height 344
SOIC-8 [mm] "duplicate of SO-8.  SOIC, 8-Leads, Body 5.0x4.0mm (max), Pitch 1.27mm, IPC Medium Density"
  rrect17% 1.45x0.6 smd: 1(-2.725,1.905) 2(-2.725,0.635) 3(-2.725,-0.635) 4(-2.725,-1.905) 5(2.725,-1.905) 6(2.725,-0.635) 8(2.725,1.905) C(2.725,0.635)
  silkscreen extent -3.5,-2.5 0.9,2.5, body extent -3,-2.45 3,2.45, height 1.63
SULLINS_PEC04SAAN [mm] "SULLINS"
  rect 1.65x1.65 hole 1: 1(-3.81,0)
  round 1.65 hole 1: 2(-1.27,0) 3(1.27,0) 4(3.81,0)
  silkscreen extent -5.59,-1.4 5.21,1.52, body extent -5.21,-1.33 5.21,1.33, height 8.38
Testpoint_Keystone_Compact [mil] "Compact SMT test point"
  rect 185x135 smd: 1(0,0)
  silkscreen extent -110,-80 110,80, body extent -75,-56 75,56, height 91
TI_Horizontal_Overlay_Small [mil]
  silkscreen extent -545,-68 545,67
WE-LHMI_1040 [mm] "Wurth"
  rect 4.1x3.5 smd: 1(-4.75,0) 2(4.75,0)
  silkscreen extent -5.5,-5.15 5.5,5.15, body extent -5.5,-5.15 5.5,5.15, height 4
WEEE_Minimum [mil] "WEEElie bin"
  silkscreen extent -95,-172 99,104

## Part data
C1 C7: library part CMP-0006669-2, "CAP, CERM, 0.047 uF, 25 V, +/- 10%, X7R, 0402", Cap_Case=0402, Manufacturer=MuRata, Supplier Part Number 1=490-3254-1-ND, TempCo=X7R, Tolerance_%=10%, Value1=Unknown, Value2=25V, ValueDisplayed=0.047uF, AEC Category=Q200, AEC Qualified=?, Cap_F=47nF, ComponentLink1Description="Datasheet link", ComponentLink1URL=http://search.murata.co.jp/Ceramy/PnsearchViewAction.do?HnOFG=ON&HnNFG=ON&SEL_CNT=50&sLang=en&sKey=GRM155R71E473KA88D&x=9&y=9&search=startwith, CompType=Capacitor, LatestRevisionDate=2017-03-09, MountType=SMT, PackageReference=0402, PartNumber=GRM155R71E473KA88D, Polarized=N, Published=2008-06-19, Publisher="Texas Instruments", RoHS=Y, SizeArea_mm2=0.5, SizeAreaWB_mm2=3, SizeX_mm=1, SizeY_mm=0.5, SizeZ_mm=0.6, Supplier 1=Digi-Key, Supplier 2=Newark, Supplier 3=Mouser, Supplier Part Number 2=14T3282, Supplier Part Number 3=81-GRM155R71E473KA88, TaMax_C=125°C, TaMin_C=-55°C, Technology=Ceramic, U/M=EA
C2 C3 C4 C5 C8 C9 C10 C20 C21 C23 C24: library part CMP-0007501-5, "CAP, CERM, 10 uF, 25 V, +/- 20%, X5R, 0603", Cap_Case=0603, Manufacturer=MuRata, Supplier Part Number 1=490-12323-1-ND, TempCo=X5R, Tolerance_%=20%, Value1=Unknown, Value2=25V, ValueDisplayed=10uF, AEC Category=Q200, AEC Grade=N/A, AEC Qualified=N, Cap_F=10µF, ComponentLink1Description="Datasheet link", ComponentLink1URL=http://search.murata.co.jp/Ceramy/image/img/A01X/G101/ENG/GRT188R61E106ME13-01.pdf, CompType=Capacitor, LatestRevisionDate=2017-03-09, MountType=SMT, PackageReference=0603, PartNumber=GRT188R61E106ME13D, Polarized=N, Published=2008-06-19, Publisher="Texas Instruments", RoHS=Y, SizeArea_mm2=1.28, SizeAreaWB_mm2=4.68, SizeX_mm=1.6, SizeY_mm=0.8, SizeZ_mm=1, Supplier 1=Digi-Key, Supplier 2=Mouser, Supplier Part Number 2=81-GRT188R61E106ME3D, TaMax_C=85°C, TaMin_C=-55°C, Technology=Ceramic, U/M=EA
C6 C11 C12 C19 C25: library part CMP-0064946-2, "CAP, CERM, 0.1 uF, 50 V,+/- 10%, X7R, 0402", Cap_Case=0402, Manufacturer=TDK, Supplier Part Number 1=445-173610-1-ND, TempCo=X7R, Tolerance_%=10%, Value1=Unknown, Value2=50V, ValueDisplayed=0.1uF, AEC Category=Q200, AEC Grade=N/A, AEC Qualified=N, Cap_F=100nF, ComponentLink1Description="Datasheet link", ComponentLink1URL=https://product.tdk.com/info/en/catalog/datasheets/mlcc_commercial_soft_en.pdf, CompType=Capacitor, LatestRevisionDate=2017-06-05, MountType=SMT, PackageReference=0402, PartNumber=C1005X7R1H104K050BE, Polarized=N, Published=2008-06-19, Publisher="Texas Instruments", RoHS=Y, SizeArea_mm2=0.5, SizeAreaWB_mm2=3, SizeX_mm=1, SizeY_mm=0.5, SizeZ_mm=0.6, Supplier 1=Digi-Key, Supplier 2=Newark, Supplier 3=Mouser, Supplier Part Number 2=92Y5763, Supplier Part Number 3=810-C1005X7R1H104KBE, TaMax_C=125°C, TaMin_C=-55°C, Technology=Ceramic, U/M=EA
  C12 C19: VDC_V=50V
C13 C14 C15 C16 C17: library part CMP-0007828-2, "CAP, CERM, 10 uF, 25 V, +/- 10%, X5R, 0805", Cap_Case=0805, Manufacturer=TDK, Supplier Part Number 1=445-5984-1-ND, TempCo=X5R, Tolerance_%=10%, Value1=Unknown, Value2=25V, ValueDisplayed=10uF, AEC Category=Q200, AEC Qualified=?, Cap_F=10µF, ComponentLink1Description="Datasheet link", ComponentLink1URL=http://www.tdk.com/pdf/TDKMLCCCapRange.pdf, CompType=Capacitor, LatestRevisionDate=2017-03-09, MountType=SMT, PackageReference=0805, PartNumber=C2012X5R1E106K125AB, Polarized=N, Published=2008-06-19, Publisher="Texas Instruments", RoHS=Y, SizeArea_mm2=2.5, SizeAreaWB_mm2=6.75, SizeX_mm=2, SizeY_mm=1.25, SizeZ_mm=1.45, Supplier 1=Digi-Key, TaMax_C=85°C, TaMin_C=-55°C, Technology=Ceramic, U/M=EA, VDC_V=25V
C18: library part CMP-0007341-5, "CAP, CERM, 4.7 uF, 16 V, +/- 10%, X5R, 0603", Cap_Case=0603, Manufacturer=MuRata, Supplier Part Number 1=490-10481-1-ND, TempCo=X5R, Tolerance_%=10%, Value1=Unknown, Value2=16V, ValueDisplayed=4.7uF, AEC Category=Q200, AEC Grade=N/A, AEC Qualified=N, Cap_F=4.7µF, ComponentLink1Description="Datasheet link", ComponentLink1URL=http://psearch.murata.com/capacitor/product/GRM188R61C475KAAJ%23.pdf, CompType=Capacitor, LatestRevisionDate=2017-03-09, MountType=SMT, PackageReference=0603, PartNumber=GRM188R61C475KAAJ, Polarized=N, Published=2008-06-19, Publisher="Texas Instruments", RoHS=Y, SizeArea_mm2=1.28, SizeAreaWB_mm2=4.68, SizeX_mm=1.6, SizeY_mm=0.8, SizeZ_mm=1, Supplier 1=Digi-Key, Supplier 2=Mouser, Supplier Part Number 2=81-GRM188R61C475KAJD, TaMax_C=85°C, TaMin_C=-55°C, Technology=Ceramic, U/M=EA
C22: library part CMP-0006235-2, "CAP, CERM, 1000 pF, 50 V, +/- 10%, X7R, 0402", Cap_Case=0402, Manufacturer=Kemet, Supplier Part Number 1=399-1032-1-ND, TempCo=X7R, Tolerance_%=10%, Value1=Unknown, Value2=50V, ValueDisplayed=1000pF, AEC Category=Q200, AEC Grade=N/A, AEC Qualified=N, Cap_F=1nF, ComponentLink1Description="Datasheet link", ComponentLink1URL=http://www.kemet.com/docfinder?Partnumber=C0402C102K5RACTU, CompType=Capacitor, LatestRevisionDate=2017-03-09, MountType=SMT, PackageReference=0402, PartNumber=C0402C102K5RACTU, Polarized=N, Published=2008-06-19, Publisher="Texas Instruments", RoHS=Y, SizeArea_mm2=0.5, SizeAreaWB_mm2=3, SizeX_mm=1, SizeY_mm=0.5, SizeZ_mm=0.6, Supplier 1=Digi-Key, Supplier 2=Newark, Supplier 3=Mouser, Supplier Part Number 2=53M7151, Supplier Part Number 3=80-C0402C102K5R, TaMax_C=125°C, TaMin_C=-55°C, Technology=Ceramic, U/M=EA, VDC_V=50V
C26: library part CMP-0011556-2, "CAP, TA, 100 uF, 6.3 V, +/- 20%, 0.015 ohm, SMD", Cap_Case=3528-21, Manufacturer=Kemet, Supplier Part Number 1=399-5306-1-ND, Tolerance_%=20%, Value1="0.015 ohm", Value2=6.3V, ValueDisplayed=100uF, AEC Category=Q200, AEC Grade=N/A, AEC Qualified=N, Cap_F=100µF, ComponentLink1Description="Datasheet link", ComponentLink1URL=http://www.kemet.com/Lists/ProductCatalog/Attachments/421/KEM_T2015_T520.pdf, CompType=Capacitor, ESR_ohm=0.015, IRMS_A=2.9A, LatestRevisionDate=2017-03-09, LatestRevisionNote="Updated supplier links", MountType=SMT, PackageReference=3528-21, PartNumber=T520B107M006ATE015, Polarized=Y, Publisher="Texas Instruments", RoHS=Y, Series=T520, SizeArea_mm2=9.8, SizeAreaWB_mm2=17.1, SizeX_mm=3.5, SizeY_mm=2.8, SizeZ_mm=2.1, Supplier 1=Digi-Key, Supplier 2=Newark, Supplier 3=Mouser, Supplier Part Number 2=74M5065, Supplier Part Number 3=80-T520B107M6ATE15, TaMax_C=105°C, TaMin_C=-55°C, Technology=TA, U/M=EA, VDC_V=6.3V
C27 C28: library part CMP-0009208-2, "CAP, CERM, 47 uF, 10 V, +/- 10%, X5R, 1210", Cap_Case=1210, Manufacturer=MuRata, Supplier Part Number 1=81-GRM32ER61A476KE20, TempCo=X5R, Tolerance_%=10%, Value1="0.001 ohm", Value2=10V, ValueDisplayed=47uF, AEC Category=Q200, AEC Qualified=?, Cap_F=47µF, ComponentLink1Description="Datasheet link", ComponentLink1URL=http://search.murata.co.jp/Ceramy/PnsearchViewAction.do?HnOFG=ON&HnNFG=ON&SEL_CNT=50&sLang=en&sKey=GRM32ER61A476KE20L&x=9&y=9&search=startwith, CompType=Capacitor, ESR_ohm=1m, LatestRevisionDate=2017-03-09, MountType=SMT, PackageReference=1210, PartNumber=GRM32ER61A476KE20L, Polarized=N, Published=2008-06-19, Publisher="Texas Instruments", RoHS=Y, SizeArea_mm2=8, SizeAreaWB_mm2=14.7, SizeX_mm=3.2, SizeY_mm=2.5, SizeZ_mm=2.7, Supplier 1=Mouser, Supplier 2=Farnell, Supplier Part Number 2=1828818, TaMax_C=85°C, TaMin_C=-55°C, Technology=Ceramic, U/M=EA, VDC_V=10V
C29 C30: library part CMP-0009228-2, "CAP, CERM, 4.7 uF, 50 V, +/- 10%, X7R, 1210", Cap_Case=1210, Manufacturer=MuRata, Supplier Part Number 1=490-1864-1-ND, TempCo=X7R, Tolerance_%=10%, Value1="0.002 ohm", Value2=50V, ValueDisplayed=4.7uF, AEC Category=Q200, AEC Qualified=?, Cap_F=4.7µF, ComponentLink1Description="Datasheet link", ComponentLink1URL=http://search.murata.co.jp/Ceramy/PnsearchViewAction.do?HnOFG=ON&HnNFG=ON&SEL_CNT=50&sLang=en&sKey=GRM32ER71H475KA88L&x=9&y=9&search=startwith, CompType=Capacitor, ESR_ohm=2m, LatestRevisionDate=2017-03-09, MountType=SMT, PackageReference=1210, PartNumber=GRM32ER71H475KA88L, Polarized=N, Published=2008-06-19, Publisher="Texas Instruments", RoHS=Y, SizeArea_mm2=8, SizeAreaWB_mm2=14.7, SizeX_mm=3.2, SizeY_mm=2.5, SizeZ_mm=2.7, Supplier 1=Digi-Key, Supplier 2=Mouser, Supplier 3=Farnell, Supplier Part Number 2=81-GRM32R71H475KA88L, Supplier Part Number 3=1828841, TaMax_C=125°C, TaMin_C=-55°C, Technology=Ceramic, U/M=EA, VDC_V=50V
C31: library part CMP-0008154-2, "CAP, CERM, 0.01 uF, 50 V, +/- 10%, X7R, 0805", Cap_Case=0805, Manufacturer=MuRata, Supplier Part Number 1=490-1664-1-ND, TempCo=X7R, Tolerance_%=10%, Value1=Unknown, Value2=50V, ValueDisplayed=0.01uF, AEC Category=Q200, AEC Qualified=?, Cap_F=10nF, ComponentLink1Description="Datasheet link", ComponentLink1URL=http://www.murata.com/products/catalog/pdf/c02e.pdf, CompType=Capacitor, LatestRevisionDate=2017-03-09, MountType=SMT, PackageReference=0805, PartNumber=GRM216R71H103KA01D, Polarized=N, Published=2008-06-19, Publisher="Texas Instruments", RoHS=Y, SizeArea_mm2=2.5, SizeAreaWB_mm2=6.75, SizeX_mm=2, SizeY_mm=1.25, SizeZ_mm=1.45, Supplier 1=Digi-Key, Supplier 2=Mouser, Supplier 3=Farnell, Supplier Part Number 2=81-GRM40X103K50D, Supplier Part Number 3=1828948, TaMax_C=125°C, TaMin_C=-55°C, Technology=Ceramic, U/M=EA, VDC_V=50V
C32: library part CMP-0007443-4, "CAP, CERM, 2200 pF, 50 V, +/- 10%, X7R, 0603", Cap_Case=0603, Manufacturer=MuRata, Supplier Part Number 1=490-1500-1-ND, TempCo=X7R, Tolerance_%=10%, Value1=Unknown, Value2=50V, ValueDisplayed=2200pF, AEC Category=Q200, AEC Qualified=?, Cap_F=2.2nF, ComponentLink1Description="Datasheet link", ComponentLink1URL=http://search.murata.co.jp/Ceramy/PnsearchViewAction.do?HnOFG=ON&HnNFG=ON&SEL_CNT=50&sLang=en&sKey=GRM188R71H222KA01D&x=9&y=9&search=startwith, CompType=Capacitor, LatestRevisionDate=2017-03-09, MountType=SMT, PackageReference=0603, PartNumber=GRM188R71H222KA01D, Polarized=N, Published=2008-06-19, Publisher="Texas Instruments", RoHS=Y, SizeArea_mm2=1.28, SizeAreaWB_mm2=4.68, SizeX_mm=1.6, SizeY_mm=0.8, SizeZ_mm=1, Supplier 1=Digi-Key, Supplier 2=Mouser, Supplier 3=Farnell, Supplier Part Number 2=81-GRM39X222K50D, Supplier Part Number 3=8819963, TaMax_C=125°C, TaMin_C=-55°C, Technology=Ceramic, U/M=EA, VDC_V=50V
C33: library part CMP-0006727-4, "CAP, CERM, 0.01 uF, 100 V, +/- 10%, X7R, 0603", Cap_Case=0603, Manufacturer=AVX, Supplier Part Number 1=478-1205-1-ND, TempCo=X7R, Tolerance_%=10%, Value1="0.098 ohm", Value2=100V, ValueDisplayed=0.01uF, AEC Category=Q200, AEC Grade=N/A, AEC Qualified=N, Cap_F=10nF, ComponentLink1Description="Datasheet link", ComponentLink1URL=http://datasheets.avx.com/X7RDielectric.pdf, CompType=Capacitor, ESR_ohm=0.098, LatestRevisionDate=2017-03-09, MountType=SMT, PackageReference=0603, PartNumber=06031C103KAT2A, Polarized=N, Published=2008-06-19, Publisher="Texas Instruments", RoHS=Y, SizeArea_mm2=1.28, SizeAreaWB_mm2=4.68, SizeX_mm=1.6, SizeY_mm=0.8, SizeZ_mm=1, Supplier 1=Digi-Key, Supplier 2=Newark, Supplier 3=Mouser, Supplier Part Number 2=96K4758, Supplier Part Number 3=581-06031C103K, TaMax_C=125°C, TaMin_C=-55°C, Technology=Ceramic, U/M=EA, VDC_V=100V
C34: library part CMP-0007196-4, "CAP, CERM, 22 pF, 50 V, +/- 5%, C0G/NP0, 0603", Cap_Case=0603, Manufacturer=MuRata, Supplier Part Number 1=490-1411-1-ND, TempCo=C0G/NP0, Tolerance_%=5%, Value1=Unknown, Value2=50V, ValueDisplayed=22pF, AEC Category=Q200, AEC Qualified=?, Cap_F=22pF, ComponentLink1Description="Datasheet link", ComponentLink1URL=http://search.murata.co.jp/Ceramy/PnsearchViewAction.do?HnOFG=ON&HnNFG=ON&SEL_CNT=50&sLang=en&sKey=GRM1885C1H220JA01D&x=9&y=9&search=startwith, CompType=Capacitor, LatestRevisionDate=2017-03-09, MountType=SMT, PackageReference=0603, PartNumber=GRM1885C1H220JA01D, Polarized=N, Published=2008-06-19, Publisher="Texas Instruments", RoHS=Y, SizeArea_mm2=1.28, SizeAreaWB_mm2=4.68, SizeX_mm=1.6, SizeY_mm=0.8, SizeZ_mm=1, Supplier 1=Digi-Key, Supplier 2=Mouser, Supplier 3=Farnell, Supplier Part Number 2=81-GRM39C220J50, Supplier Part Number 3=8819831, TaMax_C=125°C, TaMin_C=-55°C, Technology=Ceramic, U/M=EA, VDC_V=50V
C35 C36 C37: library part CMP-0006339-4, "CAP, CERM, 10 uF, 10 V, +/- 20%, X5R, 0402", Cap_Case=0402, Manufacturer="Samsung Electro-Mechanics", TempCo=X5R, Tolerance_%=20%, Value1=Unknown, Value2=10V, ValueDisplayed=10uF, AEC Category=Q200, AEC Grade=N/A, AEC Qualified=N, Cap_F=10µF, ComponentLink1Description="Datasheet link", ComponentLink1URL=http://www.samsungsem.com/kr/support/product-search/mlcc/__icsFiles/afieldfile/2018/06/21/CL05A106MP5NUNC.pdf, CompType=Capacitor, MountType=SMT, PackageReference=0402, PartNumber=CL05A106MP5NUNC, Polarized=N, RoHS=Y, SizeArea_mm2=0.5, SizeAreaWB_mm2=3, SizeX_mm=1, SizeY_mm=0.5, SizeZ_mm=0.6, TaMax_C=85°C, TaMin_C=-55°C, Technology=Ceramic, U/M=EA, VDC_V=10V
C38 C39: library part CMP-0007844-2, "CAP, CERM, 22 uF, 35 V, +/- 20%, X5R, 0805", Cap_Case=0805, Manufacturer=TDK, Supplier Part Number 1=445-14428-1-ND, TempCo=X5R, Tolerance_%=20%, Value1="0.00205 ohm", Value2=35V, ValueDisplayed=22uF, AEC Category=Q200, AEC Grade=N/A, AEC Qualified=N, Cap_F=22µF, ComponentLink1Description="Datasheet link", ComponentLink1URL=https://product.tdk.com/en/search/capacitor/ceramic/mlcc/info?part_no=C2012X5R1V226M125AC, CompType=Capacitor, ESR_ohm=2.05m, IRMS_A=4.55587A, LatestRevisionDate=2017-03-09, MountType=SMT, PackageReference=0805, PartNumber=C2012X5R1V226M125AC, Polarized=N, Published=2008-06-19, Publisher="Texas Instruments", RoHS=Y, SizeArea_mm2=2.5, SizeAreaWB_mm2=6.75, SizeX_mm=2, SizeY_mm=1.25, SizeZ_mm=1.45, Supplier 1=Digi-Key, TaMax_C=85°C, TaMin_C=-55°C, Technology=Ceramic, U/M=EA
C40 C43: library part CMP-0006370-2, "CAP, CERM, 0.1 uF, 35 V, +/- 10%, X5R, 0402", Cap_Case=0402, Manufacturer="Taiyo Yuden", Supplier Part Number 1=587-1994-1-ND, TempCo=X5R, Tolerance_%=10%, Value1=Unknown, Value2=35V, ValueDisplayed=0.1uF, AEC Category=Q200, AEC Grade=N/A, AEC Qualified=N, Cap_F=100nF, ComponentLink1Description="Datasheet link", ComponentLink1URL=http://www.yuden.co.jp/productdata/catalog/en/mlcc_all_e.pdf, CompType=Capacitor, LatestRevisionDate=2017-03-09, MountType=SMT, PackageReference=0402, PartNumber=GMK105BJ104KV-F, Polarized=N, Published=2008-06-19, Publisher="Texas Instruments", RoHS=Y, SizeArea_mm2=0.5, SizeAreaWB_mm2=3, SizeX_mm=1, SizeY_mm=0.5, SizeZ_mm=0.6, Supplier 1=Digi-Key, Supplier 2=Newark, Supplier 3=Mouser, Supplier Part Number 2=84R9117, Supplier Part Number 3=963-GMK105BJ104KV-F, TaMax_C=85°C, TaMin_C=-55°C, Technology=Ceramic, U/M=EA
  C43: VDC_V=35V
C41 C42: library part CMP-0009779-2, "CAP, CERM, 330 pF, 50 V, +/- 10%, X7R, 0201", Cap_Case=0201, Manufacturer=MuRata, Supplier Part Number 1=GRM033R71H331KA12D-ND, TempCo=X7R, Tolerance_%=10%, Value1=Unknown, Value2=50V, ValueDisplayed=330pF, AEC Category=Q200, AEC Grade=N/A, AEC Qualified=N, Cap_F=330pF, ComponentLink1Description="Datasheet link", ComponentLink1URL=http://psearch.en.murata.com/capacitor/product/GRM033R71H331KA12%23.pdf, CompType=Capacitor, LatestRevisionDate=2017-03-09, MountType=SMT, PackageReference=0201, PartNumber=GRM033R71H331KA12D, Polarized=N, Published=2008-06-19, Publisher="Texas Instruments", RoHS=Y, SizeArea_mm2=0.18, SizeAreaWB_mm2=2.08, SizeX_mm=0.6, SizeY_mm=0.3, SizeZ_mm=0.33, Supplier 1=Digi-Key, Supplier 2=Mouser, Supplier Part Number 2=81-GRM033R71H331KA2D, TaMax_C=125°C, TaMin_C=-55°C, Technology=Ceramic, U/M=EA
C44: library part CMP-0007357-5, "CAP, CERM, 4.7 uF, 35 V, +/- 10%, X5R, 0603", Cap_Case=0603, Manufacturer=MuRata, Supplier Part Number 1=490-7205-1-ND, TempCo=X5R, Tolerance_%=10%, Value1=Unknown, Value2=35V, ValueDisplayed=4.7uF, AEC Category=Q200, AEC Qualified=?, Cap_F=4.7µF, ComponentLink1Description="Datasheet link", ComponentLink1URL=http://psearch.murata.com/capacitor/product/GRM188R6YA475KE15%23.pdf, CompType=Capacitor, LatestRevisionDate=2017-03-09, MountType=SMT, PackageReference=0603, PartNumber=GRM188R6YA475KE15D, Polarized=N, Published=2008-06-19, Publisher="Texas Instruments", RoHS=Y, SizeArea_mm2=1.28, SizeAreaWB_mm2=4.68, SizeX_mm=1.6, SizeY_mm=0.8, SizeZ_mm=1, Supplier 1=Digi-Key, Supplier 2=Newark, Supplier 3=Mouser, Supplier Part Number 2=68X2784, Supplier Part Number 3=81-GRM188R6YA475KE5D, TaMax_C=85°C, TaMin_C=-55°C, Technology=Ceramic, U/M=EA
C45 C46 C47 C48: library part CMP-0006236-2, "CAP, CERM, 0.01 uF, 50 V, +/- 5%, X7R, 0402", Cap_Case=0402, Manufacturer=Kemet, Supplier Part Number 1=399-7758-1-ND, TempCo=X7R, Tolerance_%=5%, Value1=Unknown, Value2=50V, ValueDisplayed=0.01uF, AEC Category=Q200, AEC Qualified=?, Cap_F=10nF, ComponentLink1Description="Datasheet link", ComponentLink1URL=http://www.kemet.com/Lists/ProductCatalog/Attachments/53/KEM_C1002_X7R_SMD.pdf, CompType=Capacitor, LatestRevisionDate=2017-03-09, MountType=SMT, PackageReference=0402, PartNumber=C0402C103J5RACTU, Polarized=N, Published=2008-06-19, Publisher="Texas Instruments", RoHS=Y, SizeArea_mm2=0.5, SizeAreaWB_mm2=3, SizeX_mm=1, SizeY_mm=0.5, SizeZ_mm=0.6, Supplier 1=Digi-Key, Supplier 2=Newark, Supplier 3=Mouser, Supplier Part Number 2=57J0044, Supplier Part Number 3=80-C0402C103J5R, TaMax_C=125°C, TaMin_C=-55°C, Technology=Ceramic, U/M=EA
D1: library part CMP-0002827-3, "LED, Green, SMD", Color=green, Manufacturer=Lite-On, Power_TotalModule=100mW, Value1=0.1W, Value2=2.1V, ComponentLink1Description="Datasheet link", ComponentLink1URL=https://sps06.itg.ti.com/sites/KMS/crossdivteams/altium/docs/ComponentDatasheets/LTST-C190GKT.pdf, CompType=LED, Io_A=20mA, MountType=SMT, PackageReference=1.6x0.8x0.8mm, PartNumber=LTST-C190GKT, RoHS=Y, Type=?, Vf_V=2.1V
D2: library part CMP-0028510-2, "Diode, Schottky, 40 V, 5 A, SMC", Manufacturer="Comchip Technology", Value1=5A, Value2=0.55V, AEC Category=Q101, AEC Qualified=?, ComponentLink1Description="Datasheet link", ComponentLink1URL=http://www.comchip.com.tw/cms/UserFiles/QW-BB012%20CDBC520-G%7E5100-G%20RevC809622.pdf, CompType=Diode, Green_EU RoHS=Incomplete, Green_EU RoHS-2=Incomplete, Green_Lifecycle="Not Set", Green_REACh=Incomplete, Io_A=5A, MountType=SMT, PackageReference=SMC, PartNumber=CDBC540-G, RoHS=Y, SizeArea_mm2=50.5686, SizeAreaWB_mm2=83.2686, SizeX_mm=8.13, SizeY_mm=6.22, SizeZ_mm=2.6, Tjmax_C=125°C, Type=Schottky, Vf_V=550mV, Vr_V=40V
FID1 FID2 FID3 FID4 FID5 FID6: library part CMP-0077181-1, "Fiducial mark.  There is nothing to buy or mount.", Manufacturer=N/A, ClassName=FiducialMark, CompType=Fiducial, MountType=N/A, PackageReference=N/A, PartNumber=N/A
H1 H2 H3 H4: library part CMP-0003617-1, "Machine Screw, Round, #4-40 x 1/4, Nylon, Philips panhead", Manufacturer="B&F Fastener Supply", Supplier Part Number 1=H542-ND, ClassName="Mounting Holes", ComponentLink1Description="Datasheet Link", ComponentLink1URL=http://www.fasnetdirect.com/refguide/Nylpanms.pdf, CompType=Hardware, Key="NY PMS 440 0025 PH", LatestRevisionDate=2017-03-09, MountType=N/A, PackageReference=Screw, PartNumber="NY PMS 440 0025 PH", Publisher="Texas Instruments", RoHS=Y, Supplier 1=Digi-Key
H5 H6 H7 H8: library part CMP-0003610-1, "Standoff, Hex, 0.5\"L #4-40 Nylon", Manufacturer=Keystone, Supplier Part Number 1=36-1902C-ND, ComponentLink1Description="Datasheet Link", ComponentLink1URL=http://www.keyelco.com/pdfs/M55-prod31.pdf, CompType=Hardware, Key=1902C, LatestRevisionDate=2017-03-09, MountType=N/A, PackageReference=Standoff, PartNumber=1902C, Publisher="Texas Instruments", RoHS=Y, Supplier 1=Digi-Key
J1 J2: library part CMP-0074910-1, "Terminal Block, 5.08 mm, 2x1, Brass, TH", Color=Blue, Current_A=15A, Manufacturer="On-Shore Technology", Supplier Part Number 1=ED1609-ND, Voltage_V=300V, Cert_CULUS=Y, Cert_VDE=Y, CNHeader=False, ComponentLink1Description="Datasheet URL", ComponentLink1URL=http://www.on-shore.com/sites/default/files/manuals/ed120ds.pdf, CompType="Terminal Block", ContactFinish=Brass, CT=True, Gender=Female, Green_EU RoHS=Incomplete, Green_EU RoHS-2=Incomplete, Green_Lifecycle="Not Set", Green_REACh=Incomplete, LatestRevisionDate=2017-07-12, MountType=TH, Orientation=Vertical, PackageReference="2x1 5.08 mm Terminal Block", PartNumber=ED120/2DS, PinCount=2, Pitch_mm=5.08, Publisher="Texas Instruments", RoHS=Y, Row_Count=1, Shrouded=N, Supplier 1=Digi-Key
J3: library part CMP-0055448-2, "Header (shrouded), 100mil, 5x2, High-Temperature, Gold, TH", Manufacturer=3M, Supplier Part Number 1=MHC10K-ND, ComponentLink1Description="Datasheet URL", ComponentLink1URL=http://multimedia.3m.com/mws/mediawebserver?mwsId=66666UF6EVsSyXTtMXM6MxfcEVtQEVs6EVs6EVs6E666666--&fn=ts0770.pdf, CompType=Header, Green_EU RoHS=Passed, Green_EU RoHS-2=Incomplete, Green_Lifecycle=Active, Green_REACh=Passed, MountType=TH, PackageReference="5x2 Shrouded header", PartNumber=N2510-6002-RB, RoHS=Y, Supplier 1=Digi-Key, Supplier 2=Newark, Supplier 3=Mouser, Supplier Part Number 2=18M6808, Supplier Part Number 3=517-N2510-6002RB
J4: library part CMP-0055341-2, "Terminal Block, 3.5 mm, 2x1, Tin, TH", Manufacturer=Molex, Supplier Part Number 1=WM7877-ND, CNHeader=FALSE, ComponentLink1Description="Datasheet URL", ComponentLink1URL=http://www.molex.com/pdm_docs/sd/393570002_sd.pdf, CompType="Terminal Block", CT=TRUE, Green_EU RoHS=Incomplete, Green_EU RoHS-2=Incomplete, Green_Lifecycle="Not Set", Green_REACh=Incomplete, LatestRevisionDate=26/05/2017, MountType=TH, PackageReference="Terminal Block, 3.5 mm, 2x1, TH", PartNumber=0393570002, Publisher="Texas Instruments", RoHS=Y, Supplier 1=Digi-Key, Supplier 2=Newark, Supplier 3=Mouser, Supplier Part Number 2=72K2104, Supplier Part Number 3=538-39357-0002
J5: library part CMP-0055598-2, "Header, 2.54mm, 5x2, Gold, SMT", Color=Black, Current_A=5.4A, Manufacturer=Samtec, Supplier Part Number 1=SAM8741-ND, Voltage_V=475V, Cert_CSA=Y, Cert_UL=Y, ClassName=Header, ComponentLink1Description="Datasheet URL", ComponentLink1URL=https://www.samtec.com/ftppub/cpdf/TSM-1XX-XX-XXX-XX-X-XXX-X-MKT.pdf, CompType=Header, ContactFinish=Gold, Gender=Male, Green_EU RoHS=Passed, Green_EU RoHS-2=Passed, Green_Lifecycle=Active, Green_REACh=Passed, MountType=SMT, Orientation=Vertical, PackageReference="Header, 2.54mm, 5x2, SMT", PartNumber=TSM-105-01-L-DV-P, PinCount=10, Pitch_mm=2.54, RoHS=Y, Row_Count=2, RowSpacing_mm=2.54, Shrouded=N, Supplier 1=Digi-Key, Supplier 2=Newark, Supplier 3=Farnell, Supplier Part Number 2=45P5170, Supplier Part Number 3=2417021